# EAGLE board サークルライン (EAGLE 9.7.0)
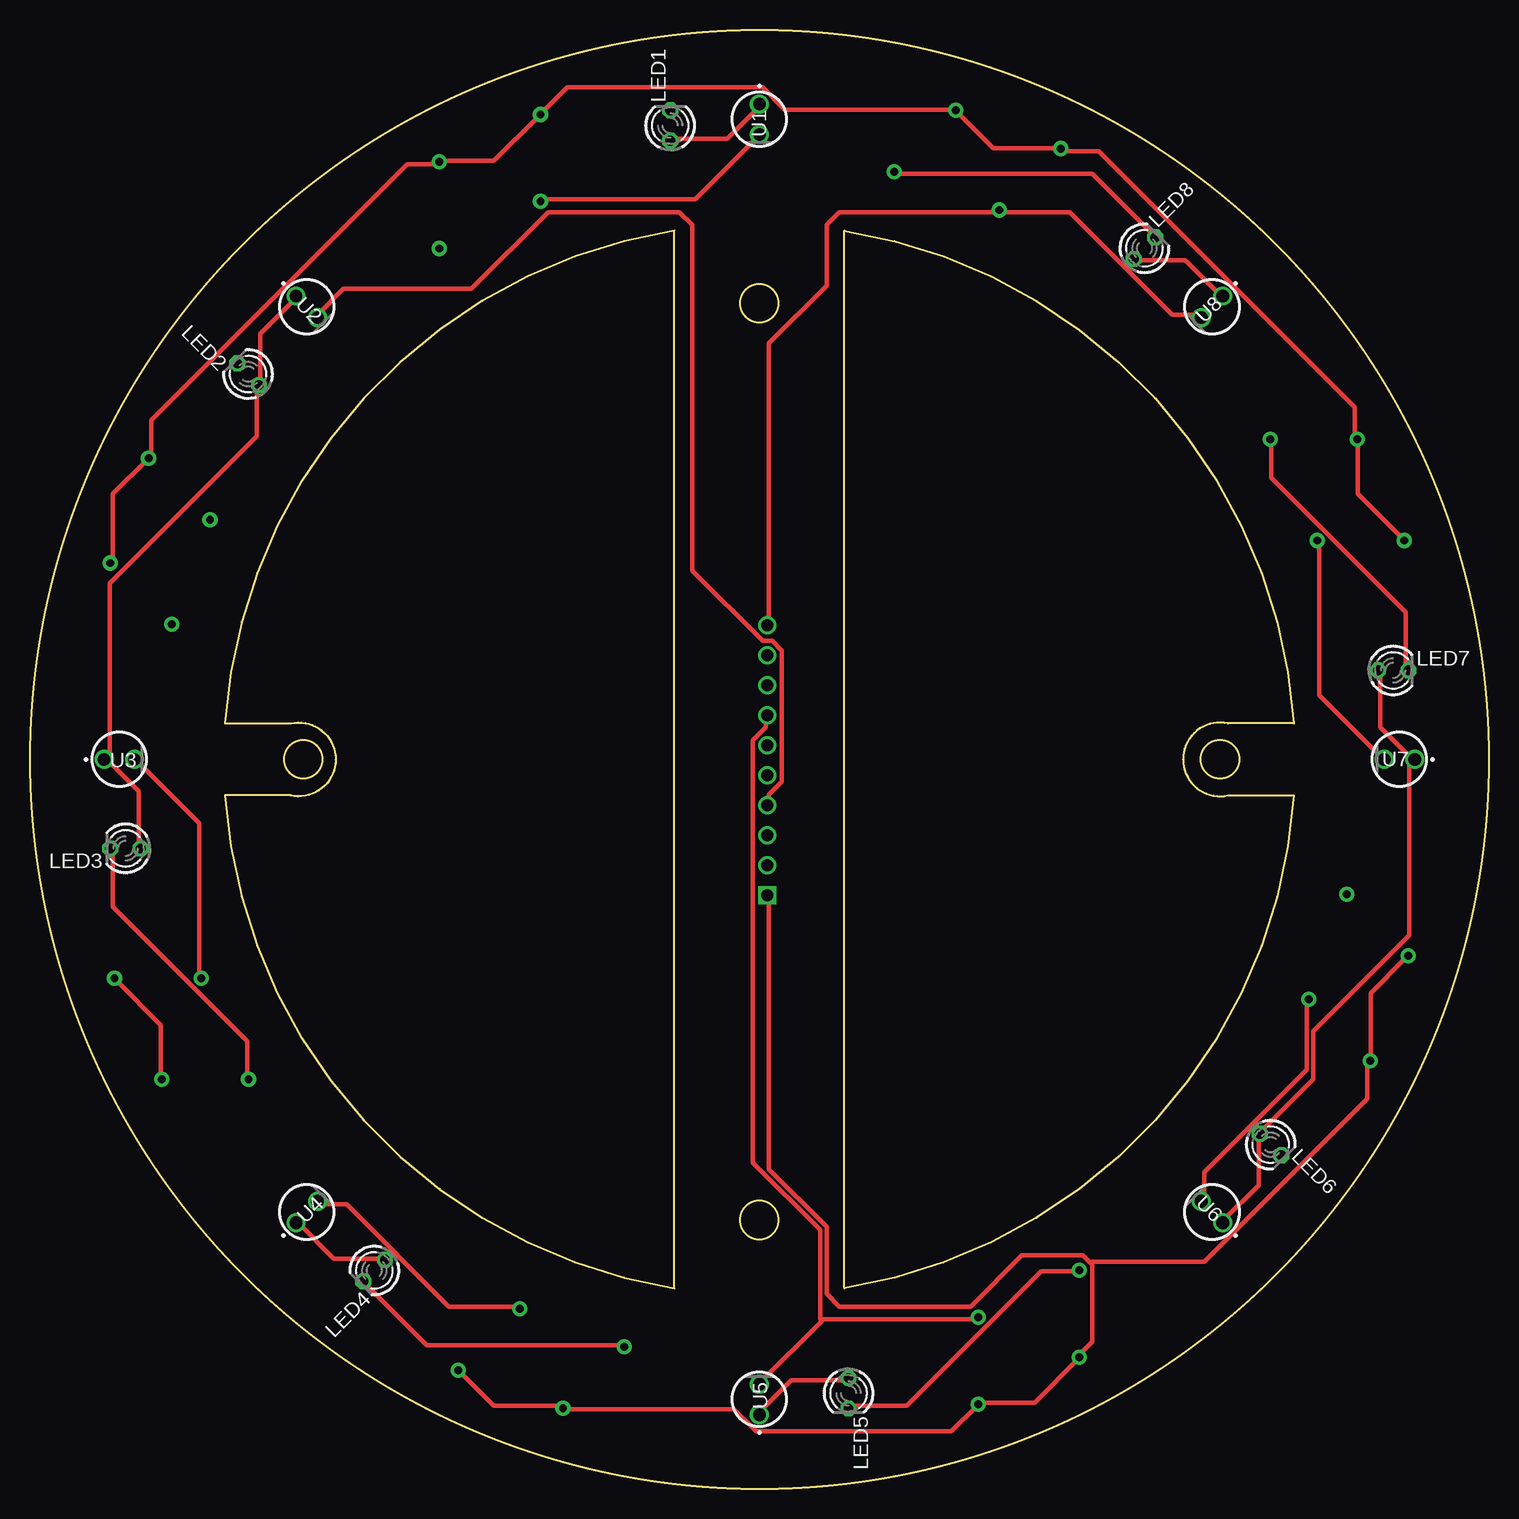
[diagram p0: board, top side]
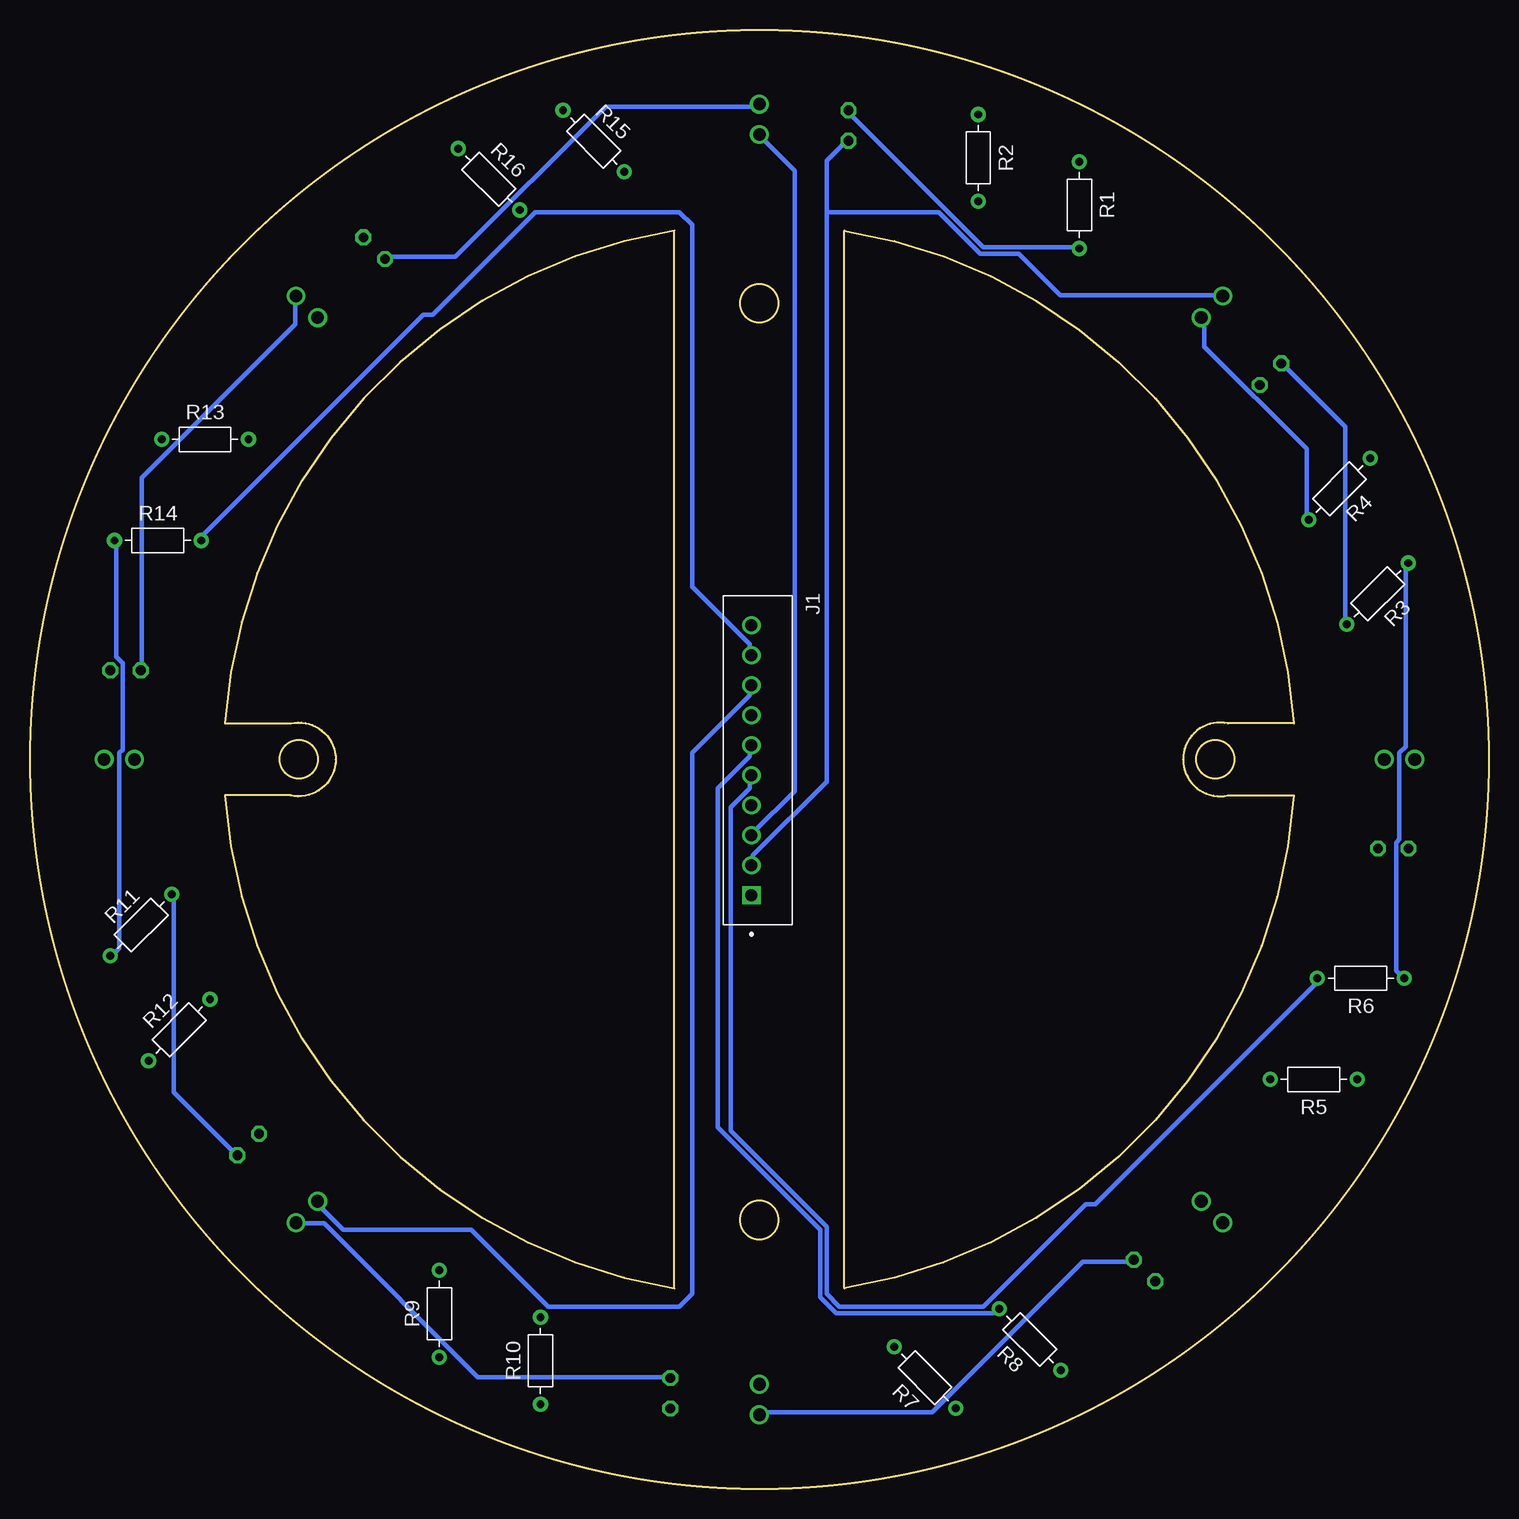
[diagram p1: board, bottom side, seen from below]

Size 121.56 x 121.56 mm. Coordinates in mm from the lower left corner, seen from the top.
Outline: 21.73,63.78 arc-205 21.73,57.78 16.25,57.78 arc77 53.7,16.71 53.7,104.85 arc77 16.25,63.78 21.73,63.78
Outline: 67.86,104.85 arc-77 105.32,63.78 99.83,63.78 arc205 99.83,57.78 105.32,57.78 arc-77 67.86,16.71 67.86,104.85
Outline: circle at 22.78,60.78 radius 1.6
Outline: circle at 60.78,22.4 radius 1.6
Outline: circle at 60.78,98.78 radius 1.6
Outline: circle at 99.16,60.78 radius 1.6
Outline: circle at 22.78,60.78 radius 1.6
Outline: circle at 60.78,22.4 radius 1.6
Outline: circle at 60.78,60.78 radius 60.78
Outline: circle at 60.78,98.78 radius 1.6
Outline: circle at 99.16,60.78 radius 1.6
Copper layers (1*16): Top / Bottom
Stack-up Default Layer Stack: Top User Defined 0.035mm / Dielectric-1 User Defined 1.5mm / Bottom User Defined 0.035mm
Design rules: minimum drill size 0.35mm, minimum copper width 15mil, keepout clearance 0mil, drill distance 6mil, via restrict clearance 0mil, dimension clearance 40mil, restrict clearance 0mil, copper clearance wire_polygon to wire_polygon 6mil, copper clearance wire_polygon to pad_smd 6mil, copper clearance wire_polygon to via 6mil, copper clearance pad_smd to pad_smd 6mil, copper clearance pad_smd to via 6mil, copper clearance via to via 6mil, copper clearance smd to pad (same net) 6mil, copper clearance smd to via (same net) 6mil, copper clearance smd to smd (same net) 6mil

## Footprints (pad centres in the part's own frame; a part is rotated, then mirrored left to right if it is on the bottom)
JST_B10B-XH-A(LF)(SN) = drill 1 square: 1 11.25,-0.525 | drill 1: 2 8.75,-0.525; 3 6.25,-0.525; 4 3.75,-0.525; 5 1.25,-0.525; 6 -1.25,-0.525; 7 -3.75,-0.525; 8 -6.25,-0.525; 9 -8.75,-0.525; 10 -11.25,-0.525
LED3MM = drill 0.813 octagon: A -1.27,0; K 1.27,0
RESAD724W46L381D178B = drill 0.66 pad 1.26: 1 -3.62,0; 2 3.62,0
NJL7502L = drill 1.05 pad 1.55: 1 1.27,0; 2 -1.27,0

## Placement (x,y rotation side)
J1  B10B-XH-A(LF)(SN)  [JST_B10B-XH-A(LF)(SN)]  60.92,60.72 270 bottom
LED1  [LED3MM]  53.36,113.6 90 top
LED2  [LED3MM]  18.18,92.88 135 top
LED3  [LED3MM]  7.96,53.36 180 top
LED4  [LED3MM]  28.68,18.18 225 top
LED5  [LED3MM]  68.21,7.96 270 top
LED6  [LED3MM]  103.38,28.68 315 top
LED7  [LED3MM]  113.6,68.21 0 top
LED8  [LED3MM]  92.88,103.38 45 top
R1  200Ω  [RESAD724W46L381D178B]  34.11,106.98 270 bottom
R2  10kΩ  [RESAD724W46L381D178B]  42.54,110.91 270 bottom
R3  200Ω  [RESAD724W46L381D178B]  9.26,74.59 225 bottom
R4  10kΩ  [RESAD724W46L381D178B]  12.44,83.32 225 bottom
R5  200Ω  [RESAD724W46L381D178B]  14.59,34.11 180 bottom
R6  10kΩ  [RESAD724W46L381D178B]  10.66,42.54 180 bottom
R7  200Ω  [RESAD724W46L381D178B]  46.98,9.26 135 bottom
R8  10kΩ  [RESAD724W46L381D178B]  38.24,12.44 135 bottom
R9  200Ω  [RESAD724W46L381D178B]  87.45,14.59 90 bottom
R10  10kΩ  [RESAD724W46L381D178B]  79.03,10.66 90 bottom
R11  200Ω  [RESAD724W46L381D178B]  112.3,46.98 45 bottom
R12  10kΩ  [RESAD724W46L381D178B]  109.12,38.24 45 bottom
R13  200Ω  [RESAD724W46L381D178B]  106.98,87.45 0 bottom
R14  10kΩ  [RESAD724W46L381D178B]  110.91,79.03 0 bottom
R15  200Ω  [RESAD724W46L381D178B]  74.59,112.3 315 bottom
R16  10kΩ  [RESAD724W46L381D178B]  83.32,109.12 315 bottom
U1  NJL7502L  [NJL7502L]  60.78,114.12 90 top
U2  NJL7502L  [NJL7502L]  23.07,98.5 135 top
U3  NJL7502L  [NJL7502L]  7.44,60.78 180 top
U4  NJL7502L  [NJL7502L]  23.07,23.07 225 top
U5  NJL7502L  [NJL7502L]  60.78,7.44 270 top
U6  NJL7502L  [NJL7502L]  98.5,23.07 315 top
U7  NJL7502L  [NJL7502L]  114.12,60.78 0 top
U8  NJL7502L  [NJL7502L]  98.5,98.5 45 top

## Library data of the parts
J1 = B10B-XH-A_LF__SN_; AVAILABILITY: In Stock; CHECK_PRICES: https://www.snapeda.com/parts/B10B-XH-A%20(LF)(SN)/JST+Sales+America+Inc./view-part/?ref=eda; DESCRIPTION: Connector Header Through Hole 10 position 0.098 (2.50mm); MF: JST Sales; MP: B10B-XH-A (LF)(SN); PACKAGE: None; PRICE: None; SNAPEDA_LINK: https://www.snapeda.com/parts/B10B-XH-A%20(LF)(SN)/JST+Sales+America+Inc./view-part/?ref=snap
LED1-LED8 = led
R1-R16 = Resistor; CATEGORY: Resistor; SUB-CATEGORY: Fixed
U1-U8 = NJL7502L; DESCRIPTION: Ambient Light Sensors Ambient Light Sensor; HEIGHT: mm; MANUFACTURER_NAME: New Japan Radio; MANUFACTURER_PART_NUMBER: NJL7502L; MOUSER_PART_NUMBER: 513-NJL7502L; MOUSER_PRICE-STOCK: https://www.mouser.co.uk/ProductDetail/NJR/NJL7502L?qs=Vf9KeiGtj%252BH8dpWd%252B41FfA%3D%3D

## Nets
5V: J1.2 LED1.A LED2.A LED3.A LED4.A LED5.A LED6.A LED7.A LED8.A U1.1 U2.1 U3.1 U4.1 U5.1 U6.1 U7.1 U8.1
A1: J1.3 R2.2 U1.2
A2: J1.4 R4.2 U2.2
A3: J1.5 R6.2 U3.2
A4: J1.6 R8.2 U4.2
A5: J1.7 R10.2 U5.2
A6: J1.8 R12.2 U6.2
A7: J1.9 R14.2 U7.2
A8: J1.10 R16.2 U8.2
GND: J1.1 R1.1 R2.1 R3.1 R4.1 R5.1 R6.1 R7.1 R8.1 R9.1 R10.1 R11.1 R12.1 R13.1 R14.1 R15.1 R16.1
N$1: LED2.K R3.2
N$2: LED1.K R1.2
N$5: LED3.K R5.2
N$7: LED4.K R7.2
N$9: LED5.K R9.2
N$11: LED6.K R11.2
N$13: LED7.K R13.2
N$15: LED8.K R15.2

## Tracks (layer width: path | path; a pad name or v marks a point on that pad's centre or on a via)
5V
  Top 0.381: LED5.A 67.98,9.04 63.45,9.04 60.78,6.38 U5.1 | LED4.A 29.58,19.18 25.31,19.18 22.38,22.11 U4.1 | LED7.A 112.52,67.98 112.52,63.45 115.19,60.78 U7.1 114.92,60.78 114.92,46.11 106.92,38.11 106.92,34.11 102.65,29.85 LED6.A 102.39,29.58 102.39,25.31 99.45,22.38 U6.1 | LED3.A 9.04,53.58 9.04,58.12 6.38,60.78 U3.1 6.64,60.78 6.64,75.45 18.91,87.72 18.91,91.72 LED2.A 19.18,91.99 19.18,96.25 22.11,99.19 U2.1 | LED8.A 91.99,102.39 96.25,102.39 99.19,99.45 U8.1 | LED1.A 53.58,112.52 58.12,112.52 60.78,115.19 U1.1
  Bottom 0.381: U5.1 60.78,6.38 46.38,6.38 33.85,18.91 29.85,18.91 LED4.A | LED5.A 68.25,9.31 84.25,9.31 97.05,22.11 99.19,22.11 U6.1 | 55.18,106.39 55.18,110.66 53.58,112.26 LED1.A | 55.18,106.39 55.18,58.92 61.32,52.78 61.32,51.98 J1.2 | LED8.A 91.72,102.65 86.12,102.65 73.58,115.19 60.78,115.19 U1.1 | 55.18,106.39 45.85,106.39 42.38,102.92 39.18,102.92 35.71,99.45 22.38,99.45 U2.1 | LED7.A 112.26,68.25 112.26,84.25 99.45,97.05 99.45,99.19 U8.1
A1
  Top 0.381: R2.2 42.65,107.45 55.45,107.45 60.78,112.79 U1.2
  Bottom 0.381: J1.3 61.32,54.65 57.85,58.12 57.85,109.86 60.78,112.79 U1.2
A2
  Top 0.381: J1.4 61.58,57.05 61.58,57.85 62.65,58.92 62.65,69.85 61.85,70.65 61.05,70.65 55.18,76.52 55.18,105.32 54.11,106.39 43.18,106.39 36.78,99.99 26.11,99.99 23.98,97.85 U2.2
  Bottom 0.381: R4.2 15.18,80.79 15.18,86.65 23.71,95.19 23.71,97.59 U2.2
A3
  Top 0.381: R6.2 14.11,42.65 14.11,55.45 8.78,60.78 U3.2
  Bottom 0.381: J1.5 61.58,59.45 61.58,58.38 63.18,56.78 63.18,29.85 55.18,21.84 55.18,16.24 54.11,15.18 42.11,15.18 33.58,23.71 32.78,23.71 14.11,42.38 R6.2
A4
  Top 0.381: R8.2 40.78,15.18 34.91,15.18 26.38,23.71 23.98,23.71 U4.2
  Bottom 0.381: J1.6 61.58,61.85 61.58,61.05 64.25,58.38 64.25,30.11 55.72,21.58 55.72,15.98 54.38,14.64 41.31,14.64 41.05,14.91 R8.2
A5
  Top 0.381: 65.98,13.98 60.78,8.78 U5.2 | 65.98,13.98 66.12,14.11 78.92,14.11 R10.2 | J1.7 61.32,64.25 61.32,63.45 60.25,62.38 60.25,27.18 65.85,21.58 65.85,14.11 65.98,13.98
A6
  Top 0.381: R12.2 106.39,40.78 106.39,34.91 97.85,26.38 97.85,23.98 U6.2
  Bottom 0.381: J1.8 61.58,66.92 61.58,66.12 66.38,61.32 66.38,16.24 67.45,15.18 78.38,15.18 84.79,21.58 95.45,21.58 97.59,23.71 U6.2
A7
  Top 0.381: R14.2 107.45,78.92 107.45,66.12 112.79,60.78 U7.2
  Bottom 0.381: J1.9 61.58,69.58 61.58,70.38 66.38,75.18 66.38,105.32 67.45,106.39 79.45,106.39 87.99,97.85 88.79,97.85 107.45,79.18 R14.2
A8
  Top 0.381: U8.2 97.59,97.85 95.19,97.85 86.65,106.39 80.79,106.39 R16.2 80.52,106.39 67.45,106.39 66.38,105.32 66.38,100.25 61.58,95.45 61.58,71.98 J1.10
GND
  Top 0.381: R3.1 6.91,77.32 6.91,82.92 9.84,85.85 R4.1 10.11,86.12 10.11,89.05 31.45,110.39 34.11,110.39 R1.1 34.38,110.66 38.65,110.66 42.38,114.39 R2.1 42.65,114.66 44.78,116.79 61.05,116.79 62.92,114.92 77.05,114.92 R15.1 77.32,114.66 80.25,111.72 85.85,111.72 R16.1 86.12,111.46 89.05,111.46 110.39,90.12 110.39,87.45 R13.1 110.66,87.45 110.66,82.92 114.39,79.18 R14.1 | R5.1 10.91,34.38 10.91,38.65 7.18,42.38 R6.1 | R11.1 114.66,44.25 111.72,41.31 111.72,35.71 R12.1 111.46,35.45 111.46,32.51 97.85,18.91 88.52,18.91 88.39,18.78 | R8.1 35.71,9.84 38.65,6.91 44.25,6.91 R7.1 44.51,6.64 58.65,6.64 60.52,4.78 76.78,4.78 78.92,6.91 R10.1 79.18,7.18 83.72,7.18 87.45,10.91 R9.1 87.45,11.18 88.52,12.24 88.52,18.64 88.39,18.78 | 88.39,18.78 87.72,19.44 82.65,19.44 78.38,15.18 67.45,15.18 66.38,16.24 66.38,21.84 61.58,26.64 61.58,49.31 J1.1
  Bottom 0.381: R3.1 6.91,77.05 6.91,61.85 7.44,61.32 7.44,54.11 7.71,53.85 7.71,43.18 7.18,42.65 R6.1 | R14.1 114.39,78.92 114.39,69.32 113.86,68.78 113.86,61.58 114.12,61.32 114.12,45.05 114.66,44.51 R11.1
N$1
  Bottom 0.381: R3.2 11.98,72.25 11.98,88.52 17.04,93.59 LED2.K
N$2
  Bottom 0.381: R1.2 34.38,103.45 42.11,103.45 53.31,114.66 LED1.K
N$5
  Top 0.381: R5.2 18.11,34.38 18.11,37.31 6.91,48.51 6.91,53.31 LED3.K
N$7
  Top 0.381: R7.2 49.31,11.98 33.05,11.98 27.98,17.04 LED4.K
N$9
  Top 0.381: R9.2 87.45,18.11 84.25,18.11 73.05,6.91 68.25,6.91 LED5.K
N$11
  Bottom 0.381: R11.2 109.59,49.31 109.59,33.05 104.52,27.98 LED6.K
N$13
  Top 0.381: R13.2 103.45,87.45 103.45,84.25 114.66,73.05 114.66,68.25 LED7.K
N$15
  Top 0.381: R15.2 72.25,109.59 88.52,109.59 93.59,104.52 LED8.K